# Altium PCB EB1_Spartan_III_1_02.PcbDoc (part 4 of 4)
Units mm, origin at the board's own origin, x right, y up, seen from the top; angles counter-clockwise.
Board outline 165.1 x 115.01 mm, 6 copper layers (Top Layer, MidLayer1, VCC Plane, GND Plane, MidLayer2, Bottom Layer); 356 components, 386 nets, 1788 pads, 779 vias.
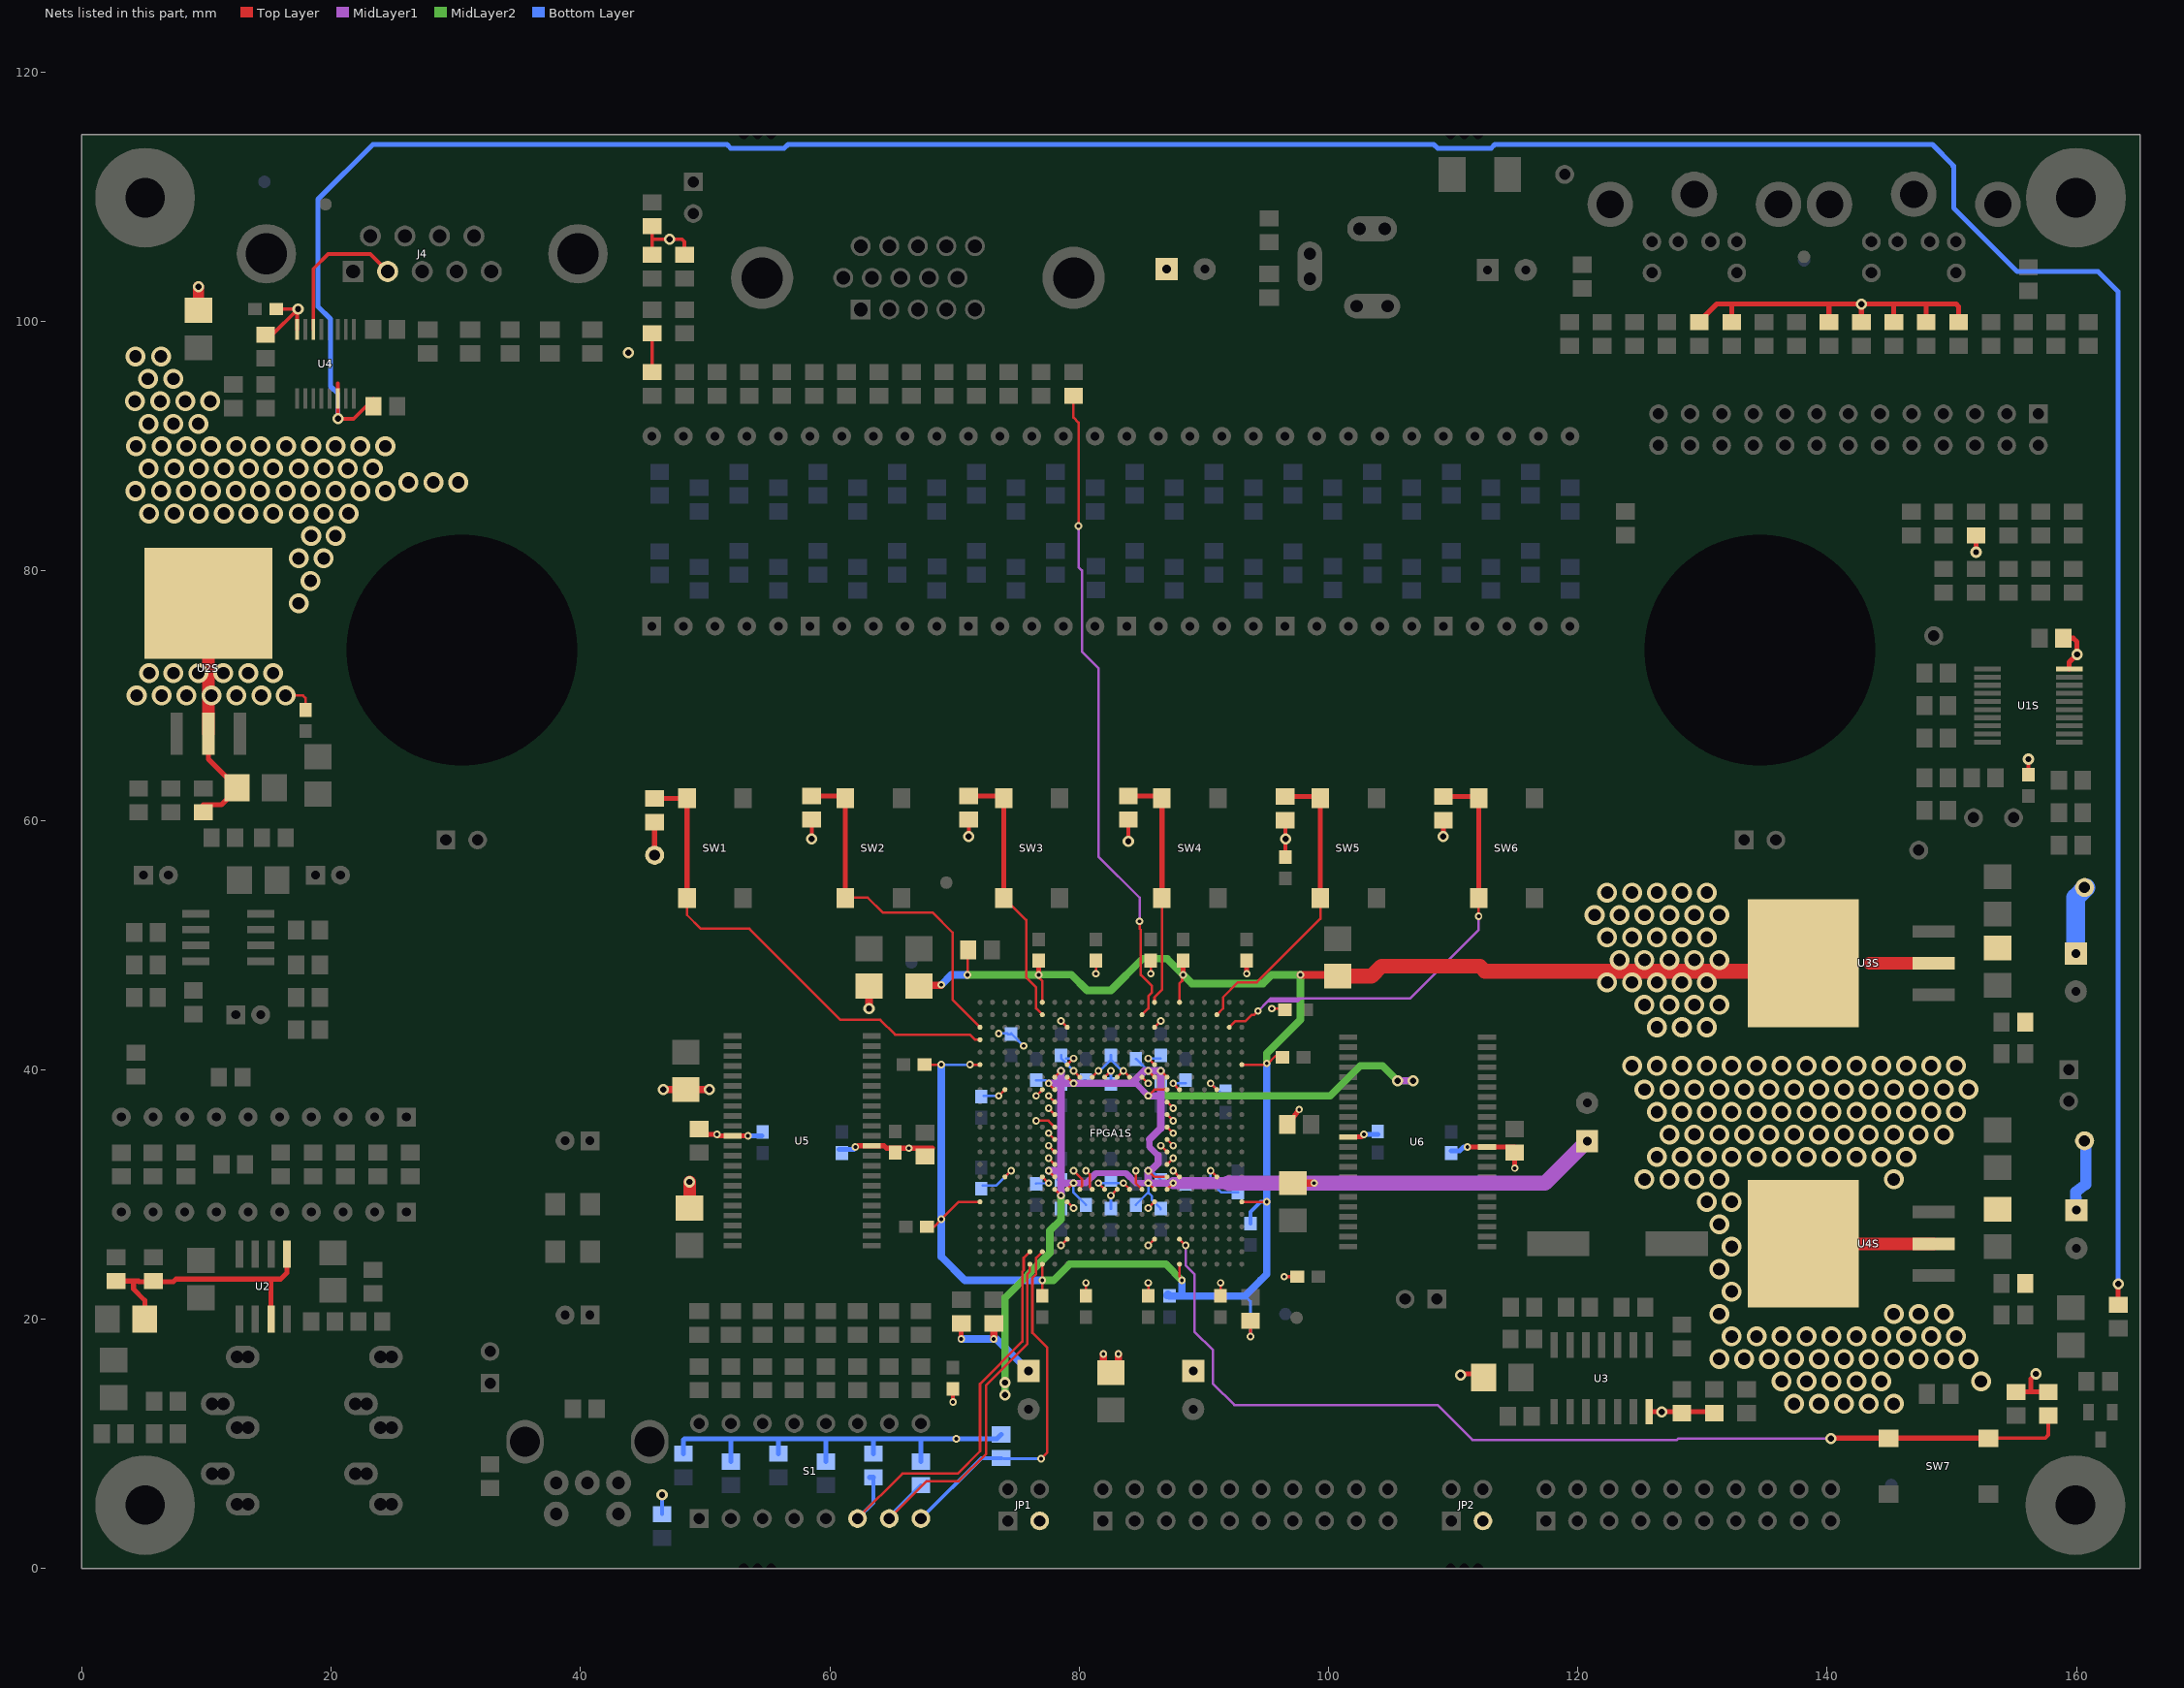
[diagram p8: the nets of this part, all layers, seen from the top]

## Via types
v1: diameter 0.6, hole 0.3, Top Layer to Bottom Layer, tented both sides, 427 vias
v2: diameter 1.6, hole 1, Top Layer to Bottom Layer, 224 vias
v3: diameter 0.9, hole 0.5, Top Layer to Bottom Layer, tented both sides, 126 vias
v4: diameter 1.27, hole 0.711, Top Layer to Bottom Layer, tented both sides, 2 vias

## Nets (pads, with @x,y where several pads share a name; then routed paths per layer and width w, separated by ;. In a path a pad name is that pad's centre, name@x,y a point inside that pad or via, vN(x,y) a via of type N, cw(c..) or ccw(c..) an arc to the next point about the centre after c; other vN are vias at no path point) (continued)
SW_DIP5: FPGA1S.AA5 R16.1 S1.6 | length 33.9
  Top Layer w0.2: S1.6@62.23,4 65.83,7.6 70.25,7.6 72.05,9.4 72.05,14.8 75.45,18.2 75.45,23.8 75.55,23.9 75.55,24.9 FPGA1S.AA5@76.05,25.4
  Bottom Layer w0.3: S1.6@62.23,4 63.5,5.27 R16.1@63.5,7.305
  Bottom Layer w0.4: R16.1@63.185,7.305 R16.1@63.5,7.305
SW_DIP6: FPGA1S.AB5 R17.1 S1.7 | length 30.3
  Top Layer w0.2: S1.7@64.77,4 67.77,7 70.35,7 72.55,9.2 72.55,14.7 75.85,18 75.85,23.6 76.05,23.8 FPGA1S.AB5@76.05,24.4
  Bottom Layer w0.3: S1.7@64.77,4 64.77,4.13 R17.1@67.31,6.67
SW_DIP7: FPGA1S.AA6 R18.1 S1.8 | length 29.2
  Top Layer w0.2: v1(76.95,8.8) 77.45,9.3 77.45,17.7 76.25,18.9 76.25,23.3 76.55,23.6 76.55,24.9 FPGA1S.AA6@77.05,25.4
  Bottom Layer w0.2: R18.1@73.95,8.8 v1(76.95,8.8)
  Bottom Layer w0.3: S1.8@67.31,4 72.16,8.85 R18.1@73.75,8.85
  Bottom Layer w0.4: S1.8@67.09,4.07 S1.8@67.165,4.145
SW_TEST: FPGA1S.Y17 R21.2 SW7.1 SW7.2 | length 83.3
  Top Layer w0.2: FPGA1S.Y17@88.05,26.4 v1(88.55,25.9)
  Top Layer w0.3: SW7.2@153.09,10.45 157.5,10.45 157.75,10.7 R21.2@157.75,12.25
  Top Layer w0.4: v3(140.29,10.4) 140.34,10.45 SW7.1@144.94,10.45 SW7.2@152.95,10.45 SW7.2@153.09,10.45
  MidLayer1 w0.2: v1(88.55,25.9) 88.55,24.3 89.25,23.6 89.25,19 90.75,17.5 90.75,14.8 92.45,13.1 108.75,13.1 111.55,10.3 127.95,10.3 128.05,10.4 v3(140.29,10.4)
SW_USER0: FPGA1S.D1 R9.2 SW1.1 SW1.2 | length 39.6
  Top Layer w0.2: SW1.1@48.55,53.775 48.55,52.4 49.65,51.3 53.55,51.3 60.85,44 64.05,44 65.25,42.8 71.25,42.8 71.65,42.4 FPGA1S.D1@72.05,42.4
  Top Layer w0.4: R9.2@45.95,61.75 48.515,61.75 SW1.2@48.55,61.785 SW1.1@48.55,53.775
SW_USER1: FPGA1S.C1 R10.2 SW2.1 SW2.2 | length 29
  Top Layer w0.2: SW2.1@61.25,53.8 63.05,53.8 64.25,52.6 68.25,52.6 69.85,51 69.85,45.6 FPGA1S.C1@72.05,43.4
  Top Layer w0.4: R10.2@58.55,61.95 61.085,61.95 SW2.2@61.25,61.785 61.25,53.8 SW2.1@61.25,53.775
SW_USER2: FPGA1S.B6 R19.2 SW3.1 SW3.2 | length 21.5
  Top Layer w0.2: SW3.1@73.95,53.775 73.975,53.775 75.75,52 75.75,47.4 76.55,46.6 76.55,44.9 FPGA1S.B6@77.05,44.4
  Top Layer w0.4: R19.2@71.15,61.95 73.9,61.95 SW3.2@73.95,62 ; SW3.1@73.95,53.775 SW3.2@73.95,61.785
SW_USER3: FPGA1S.A15 R20.2 SW4.1 SW4.2 | length 19.3
  Top Layer w0.2: FPGA1S.A15@86.05,45.4 86.05,45.8 86.65,46.4 SW4.1@86.65,53.775
  Top Layer w0.4: R20.2@83.95,61.95 86.5,61.95 SW4.2@86.55,62 ; SW4.1@86.65,53.775 SW4.2@86.65,61.785
SW_USER4: FPGA1S.B20 R22.2 SW5.1 SW5.2 | length 24.6
  Top Layer w0.2: FPGA1S.B20@91.05,44.4 91.55,44.9 91.55,45.8 92.75,47 94.25,47 99.35,52.1 SW5.1@99.35,53.775
  Top Layer w0.4: R22.2@96.52,61.91 99.225,61.91 SW5.2@99.35,61.785 SW5.1@99.35,53.775
SW_USER5: FPGA1S.C21 R23.2 SW6.1 SW6.2 | length 39.4
  Top Layer w0.2: FPGA1S.C21@92.05,43.4 92.55,43.9 93.35,43.9 93.85,44.4 94.05,44.4 v1(94.35,44.7) ; v1(112.05,52.3) SW6.1@112.05,53.775
  Top Layer w0.4: R23.2@109.22,61.91 111.925,61.91 SW6.2@112.05,61.785 SW6.1@112.05,53.775
  MidLayer1 w0.2: v1(94.35,44.7) 95.15,45.5 ; v1(112.05,52.3) 112.05,51.2 106.55,45.7 97.75,45.7 ; 95.15,45.5 97.55,45.5 97.75,45.7 ; 95.15,45.5 95.35,45.7 97.75,45.7
TX: J4.2 U4.14 | length 11.9
  Top Layer w0.3: U4.14@18.575,99.375 18.575,104.225 19.75,105.4 23.15,105.4 J4.2@24.535,104.015
V-232: C23.1 R30S.2 U4.6 | length 259.5
  Top Layer w0.3: 20.525,95.025 U4.6@20.525,93.825 20.525,92.425 v3(20.55,92.2) 21.8,92.2 23.1,93.5 C23.1@23.4,93.8
  Top Layer w0.4: R30S.2@163.35,21.15 v3(163.35,22.8)
  Bottom Layer w0.4: v3(20.55,92.2) 20.55,94.2 19.95,94.8 19.95,100.2 18.95,101.2 18.95,109.8 23.35,114.2 51.75,114.2 52.05,113.9 56.35,113.9 56.65,114.2 108.45,114.2 108.75,113.9 113.05,113.9 113.35,114.2 148.45,114.2 150.15,112.5 150.15,112.4 ; 150.1,112.45 150.15,112.4 ; v3(163.35,22.8) 163.35,102.4 161.75,104 155.25,104 150.15,109.1 150.15,112.4
VAREF: C4.1 R7.2 R8.1 U2.3 U2.5 | length 22.4
  Top Layer w0.4: R8.1@2.75,23.05 4.15,23.05 ; 4.55,23 5.75,23 7.35,23 7.55,23.2 15.15,23.2 ; 4.55,23.05 4.15,23.05 ; C4.1@5.05,20 5.05,21.5 4.15,22.4 4.15,23.05 ; U2.3@15.185,20 15.185,23.165 15.15,23.2 ; U2.5@16.455,25.2 16.455,23.705 16.195,23.445 15.95,23.2 15.15,23.2
  Top Layer w0.6: R7.2@5.75,23.05 5.8,23.05 R7.2@5.95,23.2
VCC: C1S.1 C2S.1 C3S.1 C4S.1 C5S.1 C6S.1 C7S.1 C8S.1 C13S.1 C14S.1 C15S.1 C16S.1 C17S.1 C18.1 C18S.1 C19.1 C19S.1 C20S.1 C21.1 C21S.1 C22S.1 C23S.1 C24.1 C24S.1 C25.2 C25S.1 C26.2 C26S.1 C27.2 C27S.1 C28.2 C28S.1 C29.2 C29S.1 C30S.1 C31S.1 C32S.1 C33S.1 C34S.1 C51S.1 C54S.1 C55S.1 C56S.1 C57S.1 C68S.1 C69S.1 C74S.1 C80S.1 FPGA1S.C8 FPGA1S.C15 FPGA1S.F8 FPGA1S.F15 FPGA1S.G9 FPGA1S.G10 FPGA1S.G11 FPGA1S.G12 FPGA1S.G13 FPGA1S.G14 FPGA1S.H3 FPGA1S.H6 FPGA1S.H17 FPGA1S.H20 FPGA1S.J7 FPGA1S.J16 FPGA1S.K7 FPGA1S.K16 FPGA1S.L7 FPGA1S.L16 FPGA1S.M7 FPGA1S.M16 FPGA1S.N7 FPGA1S.N16 FPGA1S.P7 FPGA1S.P16 FPGA1S.R3 FPGA1S.R6 FPGA1S.R17 FPGA1S.R20 FPGA1S.T9 FPGA1S.T10 FPGA1S.T11 FPGA1S.T12 FPGA1S.T13 FPGA1S.T14 FPGA1S.U8 FPGA1S.U15 FPGA1S.Y8 FPGA1S.Y15 JP1.3 JP2.3 R9.1 R10.1 R11.2 R12.2 R13.2 R13S.1 R14.2 R14S.1 R15.2 R15S.1 R16.2 R16S.1 R17.2 R17S.1 R18.2 R18S.1 R19.1 R19S.1 R20.1 R20S.1 R21.1 R22.1 R23.1 R32S.2 R73.2 R82.1 R96.2 R97.2 R98.2 R99.2 TP7S.1 U1S.20 U2S.2 U2S.4 U3.14 U4.16 U5.11 U5.33 U6.11 U6.33 | length 231.3
  Top Layer w0.2: v2(16.35,70) 17.75,70 17.95,69.8 C3S.1@17.95,68.85 ; v1(73.55,37.9) FPGA1S.H3@74.05,38.4 ; FPGA1S.R3@74.05,31.4 v1(74.55,31.9) ; v1(76.55,35.9) 77.55,35.9 FPGA1S.L7@78.05,35.4 ; v1(76.55,37.9) FPGA1S.H6@77.05,38.4 ; FPGA1S.R6@77.05,31.4 v1(77.55,30.9) ; v1(77.55,32.9) FPGA1S.P7@78.05,32.4 ; v1(77.55,33.9) FPGA1S.N7@78.05,33.4 ; v1(77.55,34.9) FPGA1S.M7@78.05,34.4 ; v1(77.55,36.9) FPGA1S.K7@78.05,36.4 ; v1(77.55,37.9) FPGA1S.J7@78.05,37.4 ; v1(78.55,25.9) FPGA1S.Y8@79.05,26.4 ; v1(78.55,43.9) FPGA1S.C8@79.05,43.4 ; FPGA1S.U8@79.05,29.4 v1(79.55,28.9) ; FPGA1S.F8@79.05,40.4 v1(79.55,40.9) ; v1(79.55,31.9) 80.25,31.2 80.25,30.7 FPGA1S.T9@80.05,30.4 ; v1(79.55,39.9) FPGA1S.G9@80.05,39.4 ; C7S.1@80.55,21.85 v1(80.55,22.9) ; v1(80.55,31.9) 80.85,31.6 80.85,30.6 FPGA1S.T10@81.05,30.4 ; FPGA1S.G10@81.05,39.4 v1(81.55,39.9) ; v1(81.35,47.7) C16S.1@81.35,48.7 ; v1(81.55,30.9) FPGA1S.T11@82.05,30.4 ; FPGA1S.G11@82.05,39.4 v1(82.55,39.9) ; v1(82.55,29.9) FPGA1S.T12@83.05,30.4 ; FPGA1S.G12@83.05,39.4 v1(83.55,39.9) 83.95,39.5 FPGA1S.G13@84.05,39.4 ; v1(83.55,30.9) FPGA1S.T13@84.05,30.4 ; v1(84.55,31.9) 84.55,30.9 FPGA1S.T14@85.05,30.4 ; FPGA1S.G14@85.05,39.4 v1(85.55,38.9) ; C29S.1@85.55,21.85 v1(85.55,22.9) v1@85.55,23 ; v1(85.55,25.9) FPGA1S.Y15@86.05,26.4 ; v1(85.55,28.9) FPGA1S.U15@86.05,29.4 ; v1(85.55,40.9) FPGA1S.F15@86.05,40.4 ; v1(85.75,47.7) C24S.1@85.75,48.75 ; FPGA1S.C15@86.05,43.4 v1(86.55,43.9) ; v1(86.55,33.9) FPGA1S.N16@87.05,33.4 ; FPGA1S.P16@87.05,32.4 v1(87.55,32.9) ; FPGA1S.M16@87.05,34.4 v1(87.55,33.9) ; FPGA1S.L16@87.05,35.4 v1(87.55,34.9) ; FPGA1S.K16@87.05,36.4 v1(87.55,35.9) ; FPGA1S.J16@87.05,37.4 v1(87.55,36.9) ; v1(87.55,31.9) FPGA1S.R17@88.05,31.4 ; v1(87.55,38.9) FPGA1S.H17@88.05,38.4 ; v1(90.55,31.9) FPGA1S.R20@91.05,31.4 ; v1(90.55,38.9) FPGA1S.H20@91.05,38.4 ; C2S.1@91.35,21.85 91.35,22.8 v1(91.35,22.9) ; v1(95.45,44.9) 96.5,44.9 96.55,44.9 96.532,44.795 C1S.1@96.5,44.6
  Top Layer w0.3: C21.1@14.75,98.95 15.3,98.95 v3@17.275,100.925 ; C26S.1@15.6,101 v3(17.35,101) v3@17.275,100.925 ; U4.16@17.275,99.375 v3@17.275,100.925 ; C24.1@45.75,95.95 R96.2@45.75,99.05 ; R97.2@45.75,105.35 45.75,106.6 ; R99.2@45.75,107.65 45.75,106.6 ; R98.2@48.35,105.35 48.35,106.4 48.15,106.6 v3(47.15,106.6) 45.75,106.6 ; v3(58.55,58.5) R10.1@58.55,60.05 R10.1@58.55,60.1 ; v1(69.885,13.345) C13S.1@69.885,14.395 C13S.1@69.885,14.445 ; v3(71.15,58.7) R19.1@71.15,60.05 ; v3(83.95,58.3) R20.1@83.95,60 ; v1(96.45,23.4) C8S.1@97.5,23.4 C8S.1@97.55,23.4 ; R22.1@96.52,60.01 96.55,59.98 v3(96.55,58.5) C25S.1@96.55,57.05 C25S.1@96.55,57 ; C21S.1@156.15,63.65 v3(156.15,64.9)
  Top Layer w0.4: R32S.2@9.75,61.25 11.2,61.25 12.45,62.5 C74S.1@12.45,62.6 10.15,64.9 U2S.2@10.15,66.95 ; TP7S.1@45.95,57.2 R9.1@45.95,59.85 ; C26.2@49.55,34.8 v1(50.95,34.8) 51.06,34.69 U5.11@52.21,34.69 v1(53.44,34.69) ; v1(62.05,33.8) 62.25,33.9 63.36,33.9 U5.33@63.45,33.9 ; U5.33@63.36,33.89 64.36,33.89 64.55,33.7 65.25,33.7 v1(66.35,33.7) 67.65,33.7 68.25,33.7 ; v1(93.45,47.7) C4S.1@93.45,48.75 ; C27.2@97.05,36 v1(97.65,36.8) ; U6.11@101.575,34.6 102.65,34.6 v1(102.85,34.8) ; v3(109.2,58.7) 109.22,58.72 R23.1@109.22,60.01 ; v3(110.6,15.5) 110.7,15.6 C56S.1@112.45,15.6 ; v1(111.15,33.8) U6.33@112.725,33.8 ; U6.33@112.75,33.8 U6.33@112.725,33.8 ; v1(114.95,32.1) C25.2@114.95,33.3 ; C25.2@114.95,33.8 114.935,33.8 U6.33@112.725,33.8 ; U3.14@125.73,12.565 v3(126.75,12.565) 128.35,12.565 130.435,12.565 R82.1@130.55,12.45 ; R19S.1@129.75,99.95 129.75,100 131.15,101.4 132.35,101.4 ; R18S.1@132.35,100.1 132.35,101.4 ; R17S.1@140.15,99.95 140.15,101.4 ; R16S.1@142.75,99.95 v3(142.75,101.4) ; R15S.1@145.35,99.95 145.35,101.4 ; R20S.1@147.95,99.95 147.95,101.4 ; R14S.1@150.55,99.95 150.55,101.2 150.35,101.4 147.95,101.4 ; v3(151.95,81.5) R13S.1@151.95,82.85 ; R73.2@155.15,14.15 156.35,14.15 ; v3(156.75,15.6) 156.35,15.2 156.35,14.15 ; R21.1@157.75,14.15 156.35,14.15 ; C68S.1@158.85,74.6 C68S.1@158.95,74.6 159.75,74.6 160.05,74.3 v3(160.05,73.3) 159.425,72.675 U1S.20@159.425,72.125 ; 132.35,101.4 140.15,101.4 ; 140.15,101.4 v3(142.75,101.4) ; v3(142.75,101.4) 145.35,101.4 ; 145.35,101.4 147.95,101.4
  Top Layer w0.6: v3(46.65,38.4) C55S.1@48.45,38.4 v3(50.35,38.4) ; v3(63.15,44.9) C54S.1@63.15,46.7 ; C57S.1@81.95,15.7 v1(81.95,17.2) ; C57S.1@83.15,16.2 v1(83.15,17.2)
  Top Layer w0.9: C18.1@9.35,100.8 C18.1@9.35,100.9 v3(9.35,102.8)
  Top Layer w1: U2S.4@10.05,74.6 10.15,74.5 10.15,71.8 10.15,70 U2S.2@10.15,66.95 ; C19.1@48.75,28.9 v3(48.75,31)
  Bottom Layer w0.2: C15S.1@72.25,30.7 73.35,30.7 v1(74.55,31.9) ; C27S.1@72.35,37.9 v1(73.55,37.9) ; v1(73.55,42.9) 74.25,42.9 74.3,42.85 C34S.1@74.55,42.85 ; C34S.1@74.55,42.9 74.575,42.875 v1(75.55,41.9) ; C5S.1@76.55,30.85 v1(77.55,30.9) ; C32S.1@78.55,41.15 78.55,40.9 v1(79.55,39.9) ; C32S.1@78.95,40.9 v1(79.55,40.9) ; v1(81.55,30.9) 82.55,30.9 v1(83.55,30.9) ; v1(81.55,39.9) 81.65,39.9 C28S.1@82.55,40.8 ; C80S.1@82.55,28.85 v1(82.55,29.9) ; C23S.1@82.55,38.85 v1(82.55,39.9) ; C28S.1@82.55,41.15 C28S.1@82.55,40.8 ; v1@83.55,40 v1(83.55,39.9) 83.45,39.9 C28S.1@82.55,40.8 ; v1(85.55,40.9) C19S.1@86.55,40.9 ; v1(87.55,38.9) C31S.1@88.55,38.9 ; v1(90.55,31.9) 90.55,31 91.4,30.15 C14S.1@92.75,30.15 ; v1(90.55,38.9) 91.531,38.009 C33S.1@91.65,37.9
  Bottom Layer w0.3: R11.2@46.55,4.35 v3(46.55,5.9)
  Bottom Layer w0.4: R12.2@48.26,9.205 48.26,10.31 48.35,10.4 52.15,10.4 ; R13.2@52.07,8.57 52.07,10.32 52.15,10.4 ; v1(53.44,34.69) 53.45,34.7 C18S.1@54.55,34.7 ; R14.2@55.88,9.205 55.88,10.27 55.75,10.4 ; R15.2@59.69,8.57 59.69,10.34 59.75,10.4 ; C17S.1@60.75,33.6 60.96,33.6 61.95,33.6 v1(62.05,33.8) ; R16.2@63.5,9.205 63.5,10.35 63.55,10.4 ; R17.2@67.31,8.57 67.31,10.36 67.27,10.4 ; R18.2@73.75,10.75 73.4,10.4 v1(70.15,10.4) 67.27,10.4 ; v1(102.85,34.8) C20S.1@103.95,34.8 ; C6S.1@109.85,33.5 109.855,33.5 110.55,33.5 110.85,33.8 v1(111.15,33.8) ; v3@151.85,81.4 v3(151.95,81.5) ; 52.15,10.4 55.75,10.4 ; 55.75,10.4 59.75,10.4 ; 59.75,10.4 63.55,10.4 ; 63.55,10.4 67.27,10.4
  other v2: 4.4,70 6.4,70 8.4,70 10.4,70 12.4,70 14.4,70 5.4,71.8 7.35,71.8 9.35,71.8 11.35,71.8 13.35,71.8 15.35,71.8 17.4,77.4 18.35,79.2 17.4,81 19.4,81 18.4,82.8 20.35,82.8 5.4,84.6 7.4,84.6 9.4,84.6 11.4,84.6 13.35,84.6 15.35,84.6 17.4,84.6 19.4,84.6 21.4,84.6 4.3,86.4 6.35,86.4 8.35,86.4 10.35,86.4 12.35,86.4 14.3,86.4 16.35,86.4 18.35,86.4 20.35,86.4 22.35,86.4 24.35,86.4 26.2,87.1 28.2,87.1 30.2,87.1 5.35,88.2 7.4,88.2 9.4,88.2 11.4,88.2 13.4,88.2 15.35,88.2 17.4,88.2 19.4,88.2 21.35,88.2 23.35,88.2 4.35,90 6.4,90 8.4,90 10.35,90 12.4,90 14.35,90 16.4,90 18.4,90 20.35,90 22.35,90 24.35,90 5.35,91.8 7.35,91.8 9.35,91.8 4.25,93.6 6.3,93.6 8.3,93.6 10.3,93.6 5.3,95.4 7.35,95.4 4.3,97.2 6.35,97.2
  other v3: 43.85,97.5
VCCAUX: C9S.1 C10S.1 C35S.1 C36S.1 C37S.1 C38S.1 C39S.1 C40S.1 C52S.1 C58S.1 C59S.1 C71S.1 C76S.1 FPGA1S.A6 FPGA1S.A17 FPGA1S.AB6 FPGA1S.AB17 FPGA1S.F1 FPGA1S.F22 FPGA1S.U1 FPGA1S.U22 R1S.1 R2S.1 R3S.1 R4S.1 R33S.2 TP5S.1 U3S.2 U3S.4 | length 202.6
  Top Layer w0.2: C35S.1@67.6,27.4 C35S.1@67.8,27.4 68.35,27.4 v1(68.95,28) 70.35,29.4 FPGA1S.U1@72.05,29.4 ; C10S.1@67.6,40.4 v1(68.95,40.4) ; v1(71.05,47.6) 71.05,49.1 71.1,49.15 R2S.1@71.1,49.6 ; v1(76.75,47.6) 76.835,47.315 77.05,47.1 FPGA1S.A6@77.05,45.4 ; C36S.1@76.835,21.805 76.835,21.85 76.841,21.886 76.844,21.903 76.886,21.963 76.919,22.01 77.05,22.2 v1(77.05,23.1) 77.05,23.3 FPGA1S.AB6@77.05,24.4 ; FPGA1S.AB17@88.05,24.4 88.05,23.4 v1(88.25,23.1) ; FPGA1S.A17@88.05,45.4 88.05,46.9 88.265,47.115 v1@88.265,47.6 ; FPGA1S.U22@93.05,29.4 v1(95.05,29.4) ; FPGA1S.F22@93.05,40.4 95.05,40.4 95.1,40.45 95.75,41.1 96.3,41.1 C38S.1@96.4,41.1 ; v1(93.75,18.6) R1S.1@93.75,19.85 ; v1(71.25,40.4) FPGA1S.F1@72.05,40.4 v1(71.25,40.4)
  Top Layer w0.4: v1(70.55,18.4) R3S.1@70.55,19.65 ; v1(76.75,47.6) C40S.1@76.75,48.75 ; v1(88.35,47.6) C39S.1@88.35,48.75
  Top Layer w0.6: C58S.1@67.15,46.76 v1@68.91,46.76 ; C58S.1@67.15,46.8 C58S.1@67.16,46.8 ; v1(73.15,18.4) R4S.1@73.15,19.65 ; v1(97.75,47.6) 100.65,47.6 C59S.1@100.75,47.5
  Top Layer w1: 143.39,48.54 U3S.2@148.55,48.54
  Top Layer w1.2: C59S.1@100.75,47.5 103.45,47.5 104.25,48.3 112.15,48.3 112.55,47.9 122.35,47.9 123.35,47.9 124.35,47.9 125.35,47.9 126.35,47.9 127.35,47.9 128.35,47.9 129.35,47.9 130.35,47.9 131.35,47.9 137.3,47.9 138.02,48.62 U3S.4@138.1,48.7
  MidLayer2 w0.6: v1(71.05,47.6) v1(76.75,47.6) ; v1@76.835,47.625 79.375,47.625 80.645,46.355 82.55,46.355 85.09,48.895 87.055,48.895 v1(88.35,47.6) 89.05,46.9 94.75,46.9 95.45,47.6 v1(97.75,47.6) 97.75,44 95.05,41.3 v1(95.05,40.5) ; v1(77.05,23.1) 77.95,23.1 79.25,24.4 86.95,24.4 v1(88.25,23.1)
  Bottom Layer w0.2: v1(68.95,40.4) v1(71.25,40.4) ; 93.3,21.85 93.75,21.4 v1(93.75,18.6)
  Bottom Layer w0.3: C9S.1@93.75,27.65 93.75,28.6 94.55,29.4 v1(95.05,29.4)
  Bottom Layer w0.6: v1(68.95,40.4) v1(68.95,28) 68.95,25 70.85,23.1 v1(77.05,23.1) ; v1(68.95,46.8) 69.75,47.6 v1(71.05,47.6) ; v1(70.55,18.4) v1(73.15,18.4) 73.35,18.4 C52S.1@75.95,15.824 ; C37S.1@87.125,21.975 87.05,21.9 C37S.1@87.25,21.9 ; C37S.1@87.25,21.85 88.25,21.85 ; v1(88.25,23.1) 88.25,21.85 ; v1(95.05,40.5) v1(95.05,29.4) 95.05,23.6 94.55,23.1 93.3,21.85 88.25,21.85
  Bottom Layer w1.5: C71S.1@159.95,49.324 159.95,53.8 160.707,54.557 TP5S.1@160.75,54.6
  other v2: 126.35,43.4 128.35,43.4 130.35,43.4 125.35,45.2 127.35,45.2 129.35,45.2 131.35,45.2 122.35,47 124.35,47 126.35,47 128.35,47 130.35,47 123.35,48.8 125.35,48.8 127.35,48.8 129.35,48.8 131.35,48.8 122.35,50.6 124.35,50.6 126.35,50.6 128.35,50.6 130.35,50.6 121.35,52.4 123.35,52.4 125.35,52.4 127.35,52.4 129.35,52.4 131.35,52.4 122.35,54.2 124.35,54.2 126.35,54.2 128.35,54.2 130.35,54.2
VCCINT: C11S.1 C12S.1 C41S.1 C42S.1 C43S.1 C44S.1 C45S.1 C46S.1 C47S.1 C48S.1 C49S.1 C50S.1 C53S.1 C60S.1 C72S.1 C78S.1 FPGA1S.G7 FPGA1S.G8 FPGA1S.G15 FPGA1S.G16 FPGA1S.H7 FPGA1S.H16 FPGA1S.R7 FPGA1S.R16 FPGA1S.T7 FPGA1S.T8 FPGA1S.T15 FPGA1S.T16 R37S.2 TP8S.1 U4S.2 U4S.4 | length 162.1
  Top Layer w0.2: v1(77.55,31.9) FPGA1S.R7@78.05,31.4 ; v1(77.55,38.9) FPGA1S.H7@78.05,38.4 ; FPGA1S.T7@78.05,30.4 v1(78.55,29.9) ; FPGA1S.G7@78.05,39.4 v1(78.55,39.9) ; FPGA1S.T8@79.05,30.4 v1(79.55,30.9) ; FPGA1S.G8@79.05,39.4 v1(79.55,38.9) ; v1(85.55,30.9) FPGA1S.T15@86.05,30.4 ; v1(85.55,31.9) 86.05,31.4 FPGA1S.R16@87.05,31.4 ; v1(85.55,37.9) 86.05,38.4 FPGA1S.H16@87.05,38.4 ; v1(85.55,39.9) FPGA1S.G15@86.05,39.4 ; v1(86.55,39.9) FPGA1S.G16@87.05,39.4 ; FPGA1S.T16@87.05,30.4 v1(87.55,30.9)
  Top Layer w0.6: C60S.1@97.15,30.9 v1(98.85,30.9)
  Top Layer w1: U4S.4@141.65,25.9 141.785,26.035 U4S.2@148.55,26.035
  MidLayer1 w0.5: v1(79.55,30.9) 80.55,30.9 81.35,31.7 83.75,31.7 84.55,30.9 v1(85.55,30.9) ; 84.55,38.9 v1(85.55,37.9) ; 85.65,34.4 85.65,33.8 86.35,33.1
  MidLayer1 w0.6: v1(77.55,31.9) 78.55,31.9 ; v1(77.55,38.9) 78.55,38.9 ; v1(78.55,29.9) 78.55,30.9 ; v1(78.55,39.9) 78.55,38.9 ; v1(79.55,30.9) 78.55,30.9 ; 84.55,38.9 84.45,38.9 ; v1(85.55,31.9) v1@85.55,31.7 ; v1(85.55,37.9) 86.45,37.9 86.55,38 ; 85.65,34.4 86.55,35.3 86.55,38 ; 86.35,33.1 86.35,32.5 85.65,31.8 v1@85.55,31.7 ; v1(87.55,30.9) v1(85.55,30.9) v1@85.55,31.7 ; v3(105.55,39.1) v3(106.8,39.1) ; 78.55,30.9 78.55,31.9 ; 78.55,31.9 78.55,38.9 ; 78.55,38.9 v1(79.55,38.9) 84.45,38.9 ; 84.45,38.9 84.45,39.1 85.25,39.9 v1(85.55,39.9) v1(86.55,39.9) 86.55,38
  MidLayer1 w1: v1(87.55,30.9) 91.95,30.9
  MidLayer1 w1.2: 91.95,30.9 v1(98.85,30.9) 117.374,30.9 C53S.1@120.75,34.276
  MidLayer2 w0.6: v3(74.05,13.9) v3(74.05,14.9) 74.05,21.7 77.65,25.3 77.65,27.1 78.55,28 v1(78.55,29.9) ; v1(86.55,39.9) 86.55,38.4 87.05,37.9 100.15,37.9 102.55,40.3 104.35,40.3 v3(105.55,39.1) v3(106.8,39.1)
  Bottom Layer w0.2: C45S.1@76.55,39.15 77.3,39.15 v1(77.55,38.9) ; v1(77.55,31.9) 78.3,31.15 C11S.1@78.55,31.15 ; C50S.1@78.55,28.85 78.55,28.9 v1(78.55,29.9) ; C49S.1@78.55,38.85 v1(78.55,39.9) ; v1(79.55,30.9) 79.55,30.15 C47S.1@80.55,29.15 ; v1(79.55,38.9) 80.15,38.9 80.4,39.15 C12S.1@80.55,39.15 ; C43S.1@84.55,29.15 85.525,30.125 85.55,30.15 ; C44S.1@84.55,40.85 84.6,40.85 v1(85.55,39.9) ; 85.55,30.1 85.6,30.1 85.85,29.85 85.85,29.55 C46S.1@86.55,28.85 C46S.1@86.55,28.8 ; v1(85.55,30.9) 85.55,30.15 ; v1(85.55,31.9) 85.8,31.9 C42S.1@86.55,31.15 ; 85.575,30.125 85.55,30.15 ; C41S.1@86.55,38.85 v1(86.55,39.9) ; v1(87.55,30.9) 88.5,30.9 C48S.1@88.55,30.85
  Bottom Layer w0.9: C72S.1@160,28.724 159.95,30.2 160.75,30.8 160.75,34.29 160.75,34.4 TP8S.1@160.655,34.29 160.655,34.395 TP8S.1@160.65,34.4
  other v2: 137.35,13.2 139.35,13.2 141.35,13.2 143.35,13.2 145.35,13.2 136.35,15 138.35,15 140.35,15 142.35,15 144.35,15 152.35,15 131.35,16.8 133.35,16.8 135.35,16.8 137.35,16.8 139.35,16.8 141.35,16.8 143.35,16.8 145.35,16.8 147.35,16.8 149.35,16.8 149.35,16.8 151.35,16.8 132.35,18.6 134.35,18.6 136.35,18.6 138.35,18.6 140.35,18.6 142.35,18.6 144.35,18.6 146.35,18.6 148.35,18.6 150.35,18.6 131.35,20.4 145.35,20.4 147.35,20.4 149.35,20.4 132.35,22.2 131.35,24 132.35,25.8 131.35,27.6 130.35,29.4 132.35,29.4 125.35,31.2 127.35,31.2 129.35,31.2 131.35,31.2 145.35,31.2 126.35,33 128.35,33 130.35,33 132.35,33 134.35,33 136.35,33 138.35,33 140.35,33 142.35,33 144.35,33 146.35,33 127.35,34.8 129.35,34.8 131.35,34.8 133.35,34.8 135.35,34.8 137.35,34.8 139.35,34.8 141.35,34.8 143.35,34.8 145.35,34.8 147.35,34.8 149.35,34.8 126.35,36.6 128.35,36.6 130.35,36.6 132.35,36.6 134.35,36.6 136.35,36.6 138.35,36.6 140.35,36.6 142.35,36.6 144.35,36.6 146.35,36.6 148.35,36.6 150.35,36.6 125.35,38.4 127.35,38.4 129.35,38.4 131.35,38.4 133.35,38.4 135.35,38.4 137.35,38.4 139.35,38.4 141.35,38.4 143.35,38.4 145.35,38.4 147.35,38.4 149.35,38.4 151.35,38.4 124.35,40.3 126.35,40.3 128.35,40.3 130.35,40.3 132.35,40.3 134.35,40.3 136.35,40.3 138.35,40.3 140.35,40.3 142.35,40.3 144.35,40.3 146.35,40.3 148.35,40.3 150.35,40.3
VSYNC: FPGA1S.B14 R95.1 | length 52.6
  Top Layer w0.2: R95.1@79.55,94.05 79.55,92.3 79.95,91.9 v1(79.95,83.6) ; v1(84.85,51.9) 84.85,51.3 84.95,51.2 84.95,47.6 85.062,47.488 85.85,46.7 85.85,46.2 85.55,45.9 85.55,44.9 FPGA1S.B14@85.05,44.4
  MidLayer1 w0.2: v1(79.95,83.6) 79.95,80.3 80.225,80.025 80.225,73.525 81.55,72.2 81.55,57.1 84.85,53.8 v1(84.85,51.9)
pads on no net: D2S.3 FPGA1S.A3 FPGA1S.A7 FPGA1S.A11 FPGA1S.A16 FPGA1S.AA3 FPGA1S.AA7 FPGA1S.AA9 FPGA1S.AA11 FPGA1S.AA14 FPGA1S.AA16 FPGA1S.AA19 FPGA1S.AB7 FPGA1S.AB9 FPGA1S.AB12 FPGA1S.AB14 FPGA1S.AB16 FPGA1S.AB19 FPGA1S.B4 FPGA1S.B7 FPGA1S.B11 FPGA1S.B12 FPGA1S.B16 FPGA1S.C2 FPGA1S.C3 FPGA1S.C4 FPGA1S.C12 FPGA1S.C16 FPGA1S.D2 FPGA1S.D3 FPGA1S.D4 FPGA1S.D5 FPGA1S.D8 FPGA1S.D12 FPGA1S.D16 FPGA1S.E2 FPGA1S.E3 FPGA1S.E4 FPGA1S.E5 FPGA1S.E8 FPGA1S.E10 FPGA1S.E12 FPGA1S.F4 FPGA1S.F5 FPGA1S.F6 FPGA1S.F9 FPGA1S.F10 FPGA1S.F11 FPGA1S.F12 FPGA1S.F13 FPGA1S.F14 FPGA1S.F16 FPGA1S.G3 FPGA1S.G4 FPGA1S.G5 FPGA1S.G20 FPGA1S.H1 FPGA1S.H2 FPGA1S.H4 FPGA1S.H18 FPGA1S.H19 FPGA1S.H21 FPGA1S.H22 FPGA1S.J1 FPGA1S.J2 FPGA1S.J4 FPGA1S.J5 FPGA1S.J6 FPGA1S.J17 FPGA1S.J18 FPGA1S.J19 FPGA1S.J21 FPGA1S.J22 FPGA1S.K5 FPGA1S.K6 FPGA1S.K17 FPGA1S.K18 FPGA1S.N5 FPGA1S.N6 FPGA1S.N17 FPGA1S.N18 FPGA1S.N19 FPGA1S.N20 FPGA1S.P1 FPGA1S.P2 FPGA1S.P4 FPGA1S.P5 FPGA1S.P6 FPGA1S.P17 FPGA1S.P18 FPGA1S.P19 FPGA1S.P21 FPGA1S.P22 FPGA1S.R1 FPGA1S.R2 FPGA1S.R4 FPGA1S.R5 FPGA1S.R19 FPGA1S.R21 FPGA1S.R22 FPGA1S.T3 FPGA1S.T19 FPGA1S.T20 FPGA1S.U9 FPGA1S.U12 FPGA1S.U13 FPGA1S.U14 FPGA1S.U17 FPGA1S.V11 FPGA1S.V12 FPGA1S.V15 FPGA1S.W7 FPGA1S.W8 FPGA1S.W11 FPGA1S.W12 FPGA1S.W15 FPGA1S.W18 FPGA1S.Y4 FPGA1S.Y7 FPGA1S.Y11 FPGA1S.Y12 J1S.1 J1S.6 J1S.14 J1S.16 J1S.26 J2.2 J2.8 J3.2 J3.8 J4.9 J5.4 J5.9 J5.11 J5.12 J5.15 U3.10 U3.12

## Polygon pours and split planes (outlines as drawn)
GND on Top Layer "Top Layer-GND" (solid, remove dead copper, pour order 1003): 23.63,59.88 23.664,59.8 23.664,41.4 23.63,41.32 23.55,41.286 0.55,41.286 0.47,41.32 0.436,41.4 0.436,59.8 0.47,59.88 0.55,59.914 23.55,59.914
VCCAUX on Top Layer "Top Layer-VCCAUX" (solid, remove dead copper, pour order 1002): 166.688,60.18 166.722,60.1 166.722,59.63 166.864,40.001 166.863,40 166.864,40 166.847,39.96 166.831,39.92 166.83,39.92 166.791,39.903 166.751,39.886 166.75,39.887 166.75,39.886 151.968,39.886 151.932,39.901 151.895,39.912 148.658,42.59 106.91,42.59 106.874,42.605 106.837,42.616 98.878,49.198 98.875,49.203 98.87,49.206 98.855,49.241 98.837,49.275 98.839,49.281 98.836,49.286 98.836,60.1 98.87,60.18 98.95,60.214 166.608,60.214
VCC on Top Layer "Top Layer-VCC" (solid, remove dead copper, pour order 1001): 122.13,116.88 122.164,116.8 122.164,61 122.13,60.92 122.05,60.886 -1.45,60.886 -1.53,60.92 -1.564,61 -1.564,116.8 -1.53,116.88 -1.45,116.914 122.05,116.914
VCCINT on Top Layer "Top Layer-VCCINT" (solid, remove dead copper, pour order 1000): 166.55,53.214 166.551,53.214 166.59,53.197 166.63,53.18 166.631,53.18 166.647,53.14 166.664,53.1 166.664,53.099 166.364,-1.101 166.347,-1.14 166.33,-1.18 166.33,-1.181 166.29,-1.197 166.25,-1.214 91.95,-1.214 91.87,-1.18 91.836,-1.1 91.836,53.1 91.87,53.18 91.95,53.214 166.55,53.214
VCC on MidLayer1 "MidLayer1-VCC" (solid, remove dead copper, pour order 1005): 128.13,116.38 128.164,116.3 128.164,-3 128.13,-3.08 128.05,-3.114 -4.15,-3.114 -4.151,-3.113 -4.152,-3.114 -4.191,-3.097 -4.23,-3.08 -4.231,-3.079 -4.232,-3.079 -4.247,-3.039 -4.264,-3 -4.263,-2.999 -4.264,-2.998 -1.664,116.302 -1.647,116.341 -1.63,116.38 -1.629,116.381 -1.629,116.382 -1.589,116.397 -1.55,116.414 128.05,116.414
VCCINT on MidLayer1 "MidLayer1-VCCINT" (solid, remove dead copper, pour order 1004): 166.33,116.68 166.364,116.6 166.364,-1.2 166.33,-1.28 166.25,-1.314 73.464,-1.314 73.464,-2.4 73.447,-2.44 73.431,-2.48 73.43,-2.48 73.39,-2.497 73.35,-2.514 73.31,-2.497 73.27,-2.481 73.27,-2.48 73.253,-2.44 73.236,-2.4 73.036,44 73.053,44.04 73.069,44.08 73.07,44.08 73.109,44.097 73.15,44.114 111.903,44.114 124.636,56.847 124.636,116.6 124.67,116.68 124.75,116.714 166.25,116.714
GND on MidLayer2 "MidLayer2-GND 1" (solid, remove dead copper, pour order 1010): 117.476,118.223 117.476,118.224 167.006,117.589 167.046,117.572 167.085,117.555 167.086,117.555 167.086,117.554 167.102,117.515 167.119,117.475 167.119,52.07 167.085,51.99 167.005,51.956 117.475,51.956 117.395,51.99 117.361,52.07 117.361,118.11 117.362,118.111 117.361,118.111 117.378,118.151 117.395,118.19 117.395,118.191 117.396,118.191 117.435,118.207 117.475,118.224
GND on MidLayer2 "MidLayer2-GND" (solid, remove dead copper, pour order 1009): 16.59,61.675 19.097,59.169 25.353,59.169 27.225,61.04 27.305,61.074 34.925,61.074 35.005,61.04 45.165,50.88 45.199,50.8 45.199,19.732 47.705,17.225 47.715,17.202 47.739,17.145 47.739,-1.27 47.705,-1.35 47.625,-1.384 -1.905,-1.384 -1.906,-1.383 -1.906,-1.384 -1.946,-1.367 -1.985,-1.35 -1.986,-1.35 -2.002,-1.31 -2.019,-1.27 -2.018,-1.269 -2.019,-1.269 -1.384,61.596 -1.367,61.636 -1.35,61.675 -1.35,61.676 -1.31,61.692 -1.27,61.709 16.51,61.709
VCC on MidLayer2 "MidLayer2-VCC" (solid, remove dead copper, pour order 1008): 118.785,117.572 118.825,117.556 118.825,117.555 118.842,117.515 118.859,117.476 118.859,117.475 118.859,67.31 118.825,67.23 114.38,62.785 114.3,62.751 25.4,62.751 25.32,62.785 20.908,67.196 -2.54,67.196 -2.62,67.23 -2.654,67.31 -2.654,116.84 -2.637,116.88 -2.621,116.92 -2.62,116.92 -2.58,116.937 -2.541,116.954 118.744,117.589 118.745,117.589
VCCINT on MidLayer2 "MidLayer2-VCCINT" (solid, remove dead copper, pour order 1007): 168.276,42.658 168.276,42.659 168.316,42.642 168.355,42.625 168.356,42.625 168.356,42.624 168.372,42.585 168.389,42.545 168.388,42.544 168.389,42.544 167.754,-7.621 167.737,-7.661 167.72,-7.7 167.72,-7.701 167.719,-7.701 167.68,-7.717 167.64,-7.734 167.639,-7.733 167.639,-7.734 167.599,-7.717 167.56,-7.7 167.559,-7.7 167.559,-7.699 167.543,-7.66 167.526,-7.62 167.526,-3.289 71.12,-3.289 71.04,-3.255 71.006,-3.175 71.006,42.545 71.04,42.625 71.12,42.659 168.275,42.659
VCCAUX on MidLayer2 "MidLayer2-VCCAUX" (solid, remove dead copper, pour order 1006): 164.289,56.998 164.328,56.982 164.329,56.981 164.33,56.98 164.346,56.941 164.364,56.903 164.764,41.903 164.763,41.902 164.764,41.9 164.748,41.861 164.732,41.822 164.731,41.821 164.73,41.82 164.691,41.804 164.653,41.786 164.652,41.787 164.65,41.786 111.597,41.786 97.364,27.553 97.364,18.6 97.33,18.52 90.63,11.82 90.55,11.786 66.15,11.786 66.07,11.82 66.036,11.9 66.036,49.9 66.07,49.98 66.15,50.014 75.403,50.014 78.77,53.38 78.85,53.414 118.203,53.414 121.77,56.98 121.85,57.014 164.25,57.014
VCCINT on Bottom Layer "Bottom Layer-VCCINT" (solid, remove dead copper, pour order 1013): 168.13,66.18 168.164,66.1 168.164,-4.2 168.13,-4.28 168.05,-4.314 66.25,-4.314 66.17,-4.28 66.136,-4.2 66.136,45.6 66.17,45.68 66.25,45.714 107.503,45.714 119.27,57.48 119.35,57.514 141.803,57.514 150.47,66.18 150.55,66.214 168.05,66.214
VCC on Bottom Layer "Bottom Layer-VCC" (solid, remove dead copper, pour order 1012): 83.9,116.92 83.934,116.84 83.934,-7.62 83.9,-7.7 83.82,-7.734 -1.905,-7.734 -1.906,-7.734 -1.945,-7.717 -1.985,-7.7 -1.986,-7.7 -2.002,-7.66 -2.019,-7.62 -2.019,-7.619 -1.384,116.841 -1.367,116.88 -1.35,116.92 -1.35,116.921 -1.31,116.937 -1.27,116.954 83.82,116.954
GND on Bottom Layer "Bottom Layer-GND" (solid, remove dead copper, pour order 1011): 167.72,118.825 167.754,118.745 167.754,-3.81 167.72,-3.89 167.64,-3.924 -3.175,-3.924 -3.215,-3.907 -3.255,-3.891 -3.255,-3.89 -3.272,-3.85 -3.289,-3.811 -3.924,118.744 -3.924,118.745 -3.907,118.785 -3.891,118.825 -3.89,118.825 -3.851,118.842 -3.811,118.859 -3.81,118.859 167.64,118.859
VCC on VCC Plane (split plane): 164.298,0.802 0.802,0.802 0.802,114.209 164.298,114.209
GND on GND Plane (split plane): 164.298,0.802 48.15,0.802 48.15,22.7 48.147,22.729 48.144,22.759 48.127,22.815 48.117,22.833 48.099,22.867 48.079,22.892 48.062,22.912 47.15,23.824 47.15,35.7 47.147,35.729 47.144,35.759 47.127,35.815 47.117,35.833 47.099,35.867 47.079,35.892 47.062,35.912 45.65,37.324 45.65,41.976 47.062,43.388 47.079,43.408 47.099,43.433 47.117,43.467 47.127,43.485 47.144,43.541 47.147,43.571 47.15,43.6 47.15,53.176 49.362,55.388 49.379,55.408 49.399,55.433 49.417,55.467 49.427,55.485 49.444,55.541 49.447,55.571 49.45,55.6 49.45,60.8 49.444,60.859 49.427,60.915 49.399,60.967 49.362,61.012 49.317,61.049 49.265,61.077 49.209,61.094 49.15,61.1 49.091,61.094 49.035,61.077 48.983,61.049 48.938,61.012 48.901,60.967 48.873,60.915 48.856,60.859 48.85,60.8 48.85,55.724 46.638,53.512 46.601,53.467 46.573,53.415 46.556,53.359 46.553,53.329 46.55,53.3 46.55,43.724 45.138,42.312 45.101,42.267 45.073,42.215 45.056,42.159 45.053,42.129 45.05,42.1 45.05,37.2 45.053,37.171 45.056,37.141 45.073,37.085 45.101,37.033 45.138,36.988 46.55,35.576 46.55,23.7 46.553,23.671 46.556,23.641 46.573,23.585 46.601,23.533 46.638,23.488 47.55,22.576 47.55,0.802 0.802,0.802 0.802,114.209 164.298,114.209

## Keep-outs
Top Layer:
  circle w0.254: c134.62,73.66 r12.141
  circle w0.254: c30.48,73.66 r12.141
  lines w0.4: 117.15,24.6 117.15,23.4 129.15,23.4 129.15,24.6 ; 117.15,27.6 117.15,28.8 129.15,28.8 129.15,27.6
Keep-Out Layer:
  the board outline again, w0.8

## Other copper
Top Layer:
  region net VCC: 4.68,83.2 4.68,72.1 15.75,72.1 15.75,83.2
  rectangle net VCCAUX: 132.9,42.4 144.55,55.2
  rectangle net VCCINT: 133.55,20.2 143.95,31.8
VCC Plane (plane layer: these items are gaps in the copper):
  lines w1.8: 10.45,7.6 11.35,7.6 ; 10.45,13.2 11.35,13.2 ; 12.45,5.15 13.35,5.15 ; 12.45,11.3 13.35,11.3 ; 12.45,16.95 13.35,16.95 ; 21.95,7.6 22.85,7.6 ; 21.95,13.2 22.85,13.2 ; 23.95,5.15 24.85,5.15 ; 23.95,11.3 24.85,11.3 ; 23.95,16.95 24.85,16.95 ; 98.505,103.435 98.505,105.435 ; 102.255,101.235 104.755,101.235 ; 102.505,107.435 104.505,107.435
GND Plane (plane layer: these items are gaps in the copper):
  lines w0.254: 11.799,4.302 cw(c12.696,5.138) 11.818,5.994 ; 12.319,4.191 13.462,4.191 ; 12.338,6.109 13.481,6.109 ; 13.982,4.306 ccw(c13.104,5.162) 14.001,5.998 ; 23.299,4.302 cw(c24.196,5.138) 23.318,5.994 ; 23.819,4.191 24.962,4.191 ; 23.838,6.109 24.981,6.109 ; 25.482,4.306 ccw(c24.604,5.162) 25.501,5.998 ; 97.536,103.251 97.536,105.537 ; 97.622,102.762 ccw(c98.478,103.641) 99.314,102.743 ; 97.622,106.064 cw(c98.458,105.167) 99.314,106.045 ; 99.441,103.251 99.441,105.537 ; 101.876,106.552 cw(c102.773,107.388) 101.895,108.244 ; 102.403,106.466 104.689,106.466 ; 102.403,108.371 104.689,108.371 ; 105.178,106.552 ccw(c104.299,107.408) 105.197,108.244
  lines w0.597: 47.85,-0.1 47.85,22.7 46.85,23.7 46.85,35.7 45.35,37.2 45.35,42.1 46.85,43.6 46.85,53.3 49.15,55.6 49.15,60.8
  lines w1.8: 10.45,7.6 11.35,7.6 ; 10.45,13.2 11.35,13.2 ; 12.45,11.3 13.35,11.3 ; 12.45,16.95 13.35,16.95 ; 21.95,7.6 22.85,7.6 ; 21.95,13.2 22.85,13.2 ; 23.95,11.3 24.85,11.3 ; 23.95,16.95 24.85,16.95 ; 102.255,101.235 104.755,101.235

## Silkscreen, mask and mechanical layers (free items; w line width, h text height)
Top Overlay:
  circle w1: c96.95,111.254 r0.458
  circle w0.508: c134.62,73.66 r10
  circle w0.508: c30.48,73.66 r10
  circle w0.254: c159.918,5.08 r4
  circle w0.254: c5.08,5.08 r4
  circle w0.254: c5.08,109.931 r4
  circle w0.254: c159.969,109.931 r4
  rectangle: 44.55,63 57.05,73.5
  rectangle: 57.25,63 69.75,73.5
  rectangle: 69.95,63 82.45,73.5
  rectangle: 82.65,63 95.15,73.5
  rectangle: 95.35,63 107.85,73.5
  rectangle: 108.05,63 120.55,73.5
  lines w0.08: 2.178,34.055 2.178,38.119 ; 3.829,65.551 3.829,64.916 4.718,64.027 6.496,64.027 7.004,63.519 ; 6.75,34.055 6.75,38.119 ; 7.004,58.947 8.401,58.947 9.163,59.709 ; 9.036,34.309 9.036,38.119 ; 11.068,64.662 12.338,64.662 12.592,64.408 ; 11.703,25.8 11.703,24.276 11.957,24.022 ; 16.402,101.492 17.672,101.492 ; 16.656,34.309 16.656,38.119 ; 19.196,34.309 19.196,38.119 ; 21.863,34.309 21.863,38.119 ; 24.403,34.309 24.403,38.119 ; 26.943,34.309 26.943,38.119 ; 40.15,14.1 48.35,14.1 ; 47.39,97.555 47.644,97.555 48.279,96.92 ; 62.376,93.364 62.681,93.059 80.867,93.059 81.299,93.491 82.061,93.491 ; 85.617,94.253 80.791,94.253 ; 131.083,11.576 131.972,10.687 132.48,10.687 ; 152.038,76.981 152.038,77.362 ; 155.086,75.838 155.086,77.362 ; 157.118,63.9 158.388,65.17 ; 157.626,77.362 158.896,76.092 159.658,76.092 ; 48.35,14.1 47.65,14.2 47.65,14 48.35,14.1 ; 80.791,94.253 81.491,94.153 81.491,94.353 80.791,94.253
  lines w0.2: 1.605,30.075 1.605,34.795 ; 27.605,30.075 27.605,34.795 ; 93.013,111.254 94.029,111.254 ; 93.521,110.746 93.521,111.762 ; 94.537,111.254 96.061,111.254 ; 95.47,110.4 ccw(c96.95,111.254) 95.47,112.108
  text "GND" at 47.15,113.2 h1.1
  text "5 VDC" at 85.05,110.6 h1.5
  text "PWR" at 93.85,99.5 h1.1
  text "CTS" at 26.35,94.4 h1
  text "RTS" at 29.75,94.4 h1
  text "RXD" at 36.15,94.4 h1
  text "TXD" at 39.55,94.4 h1
  text "GND" at 161.15,38.1 h1.1
  text "GND" at 106.15,18.8 h1.1
  text "GND" at 31.35,12 h1.1
  text "LOADED" at 146.05,11.5 h1.1
  text "USER HEADER A" at 91.95,9.8 h1.1
  text "USER HEADER B" at 116.25,9.7 h1.1
  text "TEST/RESET" at 143.75,3.1 h1.1
  text "LINE" at 10.25,2.3 h1.1
  text "HEAD" at 20.95,2.3 h1.1
  text "VOLUME" at 30.35,1 h1.1
  text "5V" at 73.05,1 h1.1
  text "3V3" at 75.75,1 h1.1
  text "5V" at 108.65,1 h1.1
  text "3V3" at 111.35,1 h1.1
  text "OUT" at 10.25,0.8 h1.1
  text "PHONE" at 20.95,0.8 h1.1
Bottom Overlay:
  lines w0.08: 71.393,34.69 72.79,34.69 73.552,35.452 81.807,35.452 82.188,35.833 82.188,36.341 ; 73.806,39.008 75.457,37.357 77.616,37.357 ; 76.092,41.675 76.092,43.961 ; 76.219,25.8 76.219,28.34 ; 80.918,26.689 80.918,28.34 ; 82.95,33.674 82.95,33.928 83.458,34.436 91.713,34.436 ; 84.982,41.675 84.982,43.072 ; 87.014,43.707 87.014,44.596 ; 88.538,28.34 89.3,27.578 89.3,27.07 ; 88.919,41.675 88.919,43.453
Unplated Route Details:
  lines w2.4: 0,-1.2 51.7,-1.2 ; 0,116.211 51.7,116.211 ; 56.7,-1.2 108.4,-1.2 ; 56.7,116.211 108.4,116.211 ; 113.4,-1.2 165.1,-1.2 ; 113.4,116.211 165.1,116.211
Unit PCB Boundaries:
  the board outline again, w0.2
  text "Unit PCB boundaries coincide with centre-lines of tracks" at 0,-8 h0.75
Gerber ID:
  text ".Layer_Name" at 0,-6 h0.75
Dimensions:
  text "Dimensions in millimetres" at 0,-10 h0.75
Design Information:
  drawing of 719 lines, arcs and shapes, not listed
  text "EB1 REV1.02" at 313.547,253.474 h1.27
  text "DESIGN INFORMATION" at 257.54,253.347 h1.52
  text "BOARD NAME:" at 295.132,253.347 h1.52
  text "BOARD TECHNOLOGY" at 257.54,250.807 h1.52
  text "BOARD SIZE (REFER ALSO PROFILING INFORMATION)" at 305.8,250.807 h1.27
  text "115.01mm" at 313.52,248.533 h1.52
  text "11.811" at 273.339,248.445 h1.52
  text "165.10mm" at 336.52,248.433 h1.52
  text "7.874" at 287.309,248.318 h1.52
  text "5.000" at 260.366,248.267 h1.52
  text "(Unit)" at 352.59,248.209 h1.52
  text "X" at 329.469,247.759 h1.78
  text "(MIN. TRACK/   PADS  /CLEARANCE IN 0.001'')" at 256.016,245.727 h1.27
  text "MINIMUM ANNULAR RING 0.05MM (0.002'') EXTERNAL PER IPC-2221 CLASS 3 LEVEL C AND IS THE" at 257.54,243.187 h1.27
  text "MANUFACTURING REGISTRATION ALLOWANCE" at 257.54,240.901 h1.27
  text "LAND SIZE CALCULATION MINIMUM - NOMINAL HOLE SIZE + 0.508MM (0.020'')" at 257.54,238.107 h1.27
  text "AS INSTRUCTED" at 343.57,233.713 h1.52
  text "X" at 295.183,233.586 h1.52
  text "CIRCUIT TYPE:" at 257.54,233.535 h1.52
  text "SS" at 280.4,233.535 h1.27
  text "DS" at 298.18,233.535 h1.27
  text "X" at 312.785,233.535 h1.52
  text "PTH" at 315.96,233.535 h1.27
  text "ML" at 326.882,233.535 h1.27
  text "X" at 330.692,233.535 h1.52
  text "No. OFF" at 333.74,233.535 h1.27
  text "FINGER CONNECTOR DIM PER:" at 257.54,230.487 h1.52
  text "AS SHOWN" at 333.74,230.487 h1.27
  text "No. OFF TOTAL" at 274.304,227.693 h1.52
  text "ONE SIDE" at 315.96,227.693 h1.27
  text "BOTH SIDES" at 333.74,227.439 h1.27
  text "VIAS:" at 257.54,224.772 h1.52
  text "NONE" at 268.97,224.772 h1.14
  text "X" at 277.352,224.772 h1.52
  text "FEED THRU'" at 280.4,224.772 h1.14
  text "X" at 295.132,224.772 h1.52
  text "TENTED" at 298.18,224.772 h1.14
  text "BURIED LAYER SEQUENCE" at 315.96,224.772 h1.14
  text "UNIQUE DRILL" at 280.4,221.724 h1.14
  text "2 SIZE" at 298.18,221.724 h1.14
  text "BLIND LAYER SEQUENCE" at 315.96,221.724 h1.14
  text "Layer Stack Manager (Protel)" at 292.973,219.438 h1.27
  text "X" at 330.692,219.438 h1.52
  text "AS SHOWN" at 333.74,219.438 h1.27
  text "LAYER CONSTRUCTION PER:" at 257.54,219.311 h1.52
  text "Protel" at 338.566,216.771 h1.27
  text "(PFW)" at 348.853,216.644 h1.27
  text "ARTWORK:" at 257.54,216.517 h1.52
  text "MANUAL" at 280.4,216.517 h1.27
  text "DIGITISED" at 298.18,216.517 h1.27
  text "X" at 312.912,216.517 h1.52
  text "CAD" at 315.96,216.517 h1.27
  text "TYPE" at 326.882,216.517 h1.27
  text "ARTWORK/PATTERN MASTER LIST" at 257.54,211.818 h1.52
  text "DESCRIPTION" at 258.81,209.405 h1.27
  text "DRAWING No./CAD FILE REF." at 277.479,209.405 h1.27
  text "LAYER NAME" at 318.754,209.405 h1.27
  text "GERBER FILE REF" at 339.506,209.329 h1.27
  text "PCB FILE" at 257.256,206.941 h1.27
  text "EB_Spartan_III" at 277.627,206.865 h1.27
  text "PcbDoc" at 308.869,206.865 h1.02
  text "Top Paste Mask" at 317.048,204.401 h1.02
  text "GTP" at 359.669,204.325 h1.27
  text "GERBER FILE" at 257.256,204.274 h1.27
  text "GTO" at 359.618,201.836 h1.27
  text "Top Overlay" at 317.048,201.81 h1.02
  text "GERBER FILE" at 257.256,201.734 h1.27
  text "Top Solder Mask" at 317.048,199.372 h1.02
  text "GTS" at 359.669,199.245 h1.27
  text "GERBER FILE" at 257.256,199.194 h1.27
  text "TOP LAYER" at 317.048,196.781 h1.02
  text "GTL" at 359.669,196.705 h1.27
  text "GERBER FILE" at 257.256,196.654 h1.27
  text "GERBER FILE" at 257.256,194.114 h1.27
  text "MIDLAYER1" at 317.19,194.109 h1.02
  text "G1" at 359.69,194.109 h1.27
  text "INTERNALPLANE1" at 317.048,191.741 h1.02
  text "GERBER FILE" at 257.256,191.574 h1.27
  text "GP1" at 359.669,191.565 h1.27
  text "INTERNALPLANE2" at 317.048,189.201 h1.02
  text "GP2" at 359.618,189.076 h1.27
  text "GERBER FILE" at 257.256,189.034 h1.27
  text "MIDLAYER2" at 317.048,186.661 h1.02
  text "GERBER FILE" at 257.256,186.494 h1.27
  text "G2" at 359.69,186.509 h1.27
  text "BOTTOMLAYER" at 317.048,184.101 h1.02
  text "GBL" at 359.669,184.025 h1.27
  text "GERBER FILE" at 257.256,183.954 h1.27
  text "Bottom Solder Mask" at 317.048,181.612 h1.02
  text "GBS" at 359.669,181.485 h1.27
  text "GERBER FILE" at 257.256,181.414 h1.27
  text "Bottom Overlay" at 317.048,179.021 h1.02
  text "GBO" at 359.669,178.945 h1.27
  text "GERBER FILE" at 257.256,178.874 h1.27
  text "Bottom Paste Mask" at 317.048,176.532 h1.02
  text "GBP" at 359.669,176.405 h1.27
  text "GERBER FILE" at 257.256,176.334 h1.27
  text "PCB Boundary" at 317.048,173.941 h1.02
  text "GM5" at 359.669,173.865 h1.27
  text "GERBER FILE" at 257.256,173.794 h1.27
  text "Peelable Solder Mask" at 317.048,171.401 h1.02
  text "GM2" at 359.669,171.325 h1.27
  text "GERBER FILE" at 257.256,171.254 h1.27
  text "Unplated Route Details" at 317.048,168.861 h1.02
  text "GM3" at 359.669,168.785 h1.27
  text "GERBER FILE" at 257.256,168.714 h1.27
  text "Plated Route Details" at 317.048,166.321 h1.02
  text "GM4" at 359.669,166.245 h1.27
  text "GERBER FILE" at 257.256,166.174 h1.27
  text "APERTURE LIST" at 257.256,163.811 h1.27
  text "APR" at 309.869,163.735 h1.27
  text "DRILL REPORT" at 257.256,161.271 h1.27
  text "DRR" at 309.869,161.195 h1.27
  text "EXCELLON DRILL" at 257.256,158.731 h1.27
  text "TXT" at 309.869,158.655 h1.27
  text "MATERIAL:" at 257.54,150.731 h1.52
  text "GLASS FIBRE EPOXY RESIN NEMA GRADE FR4 (MIL-S-13949H)" at 283.194,150.477 h1.27
  text "X" at 280.527,150.35 h1.52
  text "THICKNESS:" at 265.414,147.556 h1.27
  text "0.8mm" at 283.194,147.556 h1.27
  text "1.2mm" at 300.847,147.556 h1.27
  text "1.6mm" at 318.5,147.556 h1.27
  text "2.4mm" at 336.28,147.556 h1.27
  text "3.2mm" at 354.06,147.556 h1.27
  text "X" at 316.087,147.429 h1.52
  text "TOLERANCE:" at 265.287,144.508 h1.27
  text "IN A/W IPC-D-300G CLASS" at 282.94,144.508 h1.27
  text "3 LEVEL B" at 317.865,144.508 h1.27
  text "OTHER +/-" at 336.28,144.508 h1.27
  text "X" at 280.527,144.381 h1.52
  text "BOW & TWIST:" at 262.874,141.46 h1.27
  text "IN A/W IPC-D-300G CLASS" at 282.94,141.46 h1.27
  text "3 LEVEL B" at 317.865,141.46 h1.27
  text "AS SHOWN" at 336.407,141.333 h1.27
  text "X" at 280.527,141.206 h1.52
  text "COPPER THICKNESS (FINISHED)" at 265.287,138.158 h1.27
  text "OUTER:" at 270.113,135.872 h1.27
  text "18um" at 283.194,135.872 h1.27
  text "35um" at 310.245,135.872 h1.27
  text "70um" at 336.534,135.872 h1.27
  text "X" at 307.502,135.669 h1.52
  text "INNER SIGNAL:" at 261.731,132.824 h1.27
  text "18um" at 283.194,132.824 h1.27
  text "35um" at 310.245,132.824 h1.27
  text "70um" at 336.534,132.824 h1.27
  text "X" at 307.451,132.621 h1.52
  text "INNER PWR:" at 265.414,129.776 h1.27
  text "18um" at 283.194,129.776 h1.27
  text "35um" at 310.245,129.776 h1.27
  text "70um" at 336.534,129.776 h1.27
  text "X" at 307.578,129.649 h1.52
  text "STRUCTURE:" at 257.54,126.728 h1.52
  text "REFER" at 283.194,126.728 h1.27
  text "AS PER DRAWING No." at 283.067,123.553 h1.27
  text "AS SHOWN" at 336.407,123.553 h1.27
  text "X" at 333.867,123.426 h1.52
  text "DRILLING:" at 257.54,120.759 h1.52
  text "VIEWED FROM:" at 262.493,118.473 h1.27
  text "COMPONENT SIDE" at 283.194,118.473 h1.14
  text "SOLDER SIDE" at 309.991,118.473 h1.14
  text "X" at 280.527,118.219 h1.52
  text "REFERENCE:" at 264.779,115.425 h1.27
  text "AS SHOWN" at 283.067,115.298 h1.14
  text "PATTERN MASTER LIST" at 310.118,115.298 h1.14
  text "X" at 333.867,115.298 h1.52
  text "NC_DRILL FILES" at 336.407,115.298 h1.14
  text "X" at 280.527,115.171 h1.52
  text "PTH MINIMUM COPPER THICKNESS:" at 270.621,112.377 h1.27
  text "20um" at 310.245,112.377 h1.27
  text "X" at 307.578,112.25 h1.52
  text "OTHER" at 336.407,112.25 h1.27
  text "NPTH:" at 271.129,109.329 h1.27
  text "TENTED" at 283.067,109.202 h1.14
  text "X" at 307.578,109.202 h1.52
  text "PADS REMOVED" at 310.118,109.202 h1.14
  text "REMOVE PADS" at 336.407,109.202 h1.14
  text "X" at 280.527,109.075 h1.52
  text "2nd DRILL" at 283.067,106.154 h1.14
  text "BOTH" at 310.118,106.154 h1.14
  text "AS SHOWN" at 322.437,106.154 h1.14
  text "NONE" at 336.407,106.154 h1.14
  text "BOARD FINISH:" at 257.54,103.233 h1.52
  text "X" at 280.527,103.106 h1.52
  text "ETCHING" at 283.067,103.106 h1.14
  text "REFER PATTERN MASTER LIST" at 310.118,103.106 h1.14
  text "LEGEND / SCREEN PRINT:" at 277.86,100.185 h1.27
  text "NONE" at 310.118,100.058 h1.14
  text "COMPONENT" at 322.437,100.058 h1.14
  text "SOLDER" at 336.407,100.058 h1.14
  text "X" at 319.897,99.931 h1.52
  text "X" at 333.867,99.931 h1.52
  text "COLOUR:" at 268.081,97.137 h1.27
  text "WHITE" at 283.067,97.01 h1.14
  text "YELLOW" at 310.118,97.01 h1.14
  text "OTHER" at 336.407,97.01 h1.14
  text "X" at 280.527,96.883 h1.52
  text "X" at 280.527,93.962 h1.52
  text "LIQUID PHOTOIMAGEABLE" at 283.067,93.962 h1.14
  text "SCREEN PRINT" at 322.437,93.962 h1.14
  text "MATTE" at 283.067,90.914 h1.14
  text "GLOSS" at 295.767,90.914 h1.14
  text "GREEN" at 310.118,90.914 h1.14
  text "BLUE" at 322.437,90.914 h1.14
  text "G/Y" at 336.407,90.914 h1.14
  text "OTHER" at 347.837,90.914 h1.14
  text "X" at 293.1,90.787 h1.52
  text "SOLDER MASK COLOUR:" at 257.54,87.993 h1.14
  text "BLACK" at 283.067,87.866 h1.14
  text "GREEN" at 295.767,87.866 h1.14
  text "YELLOW" at 310.118,87.866 h1.14
  text "BLUE" at 322.437,87.866 h1.14
  text "OTHER" at 336.407,87.866 h1.14
  text "X" at 280.4,87.739 h1.52
  text "TRACK FINISH:" at 257.54,84.945 h1.52
  text "SELECTIVE SOLDER (HASL)" at 283.067,84.818 h1.14
  text "REFLOW SOLDER" at 322.437,84.818 h1.14
  text "SELECTIVE GOLD" at 283.067,81.77 h1.14
  text "um  (AREA" at 310.118,81.77 h1.14
  text "sq. mm)" at 337.931,81.77 h1.14
  text "IMMERSION GOLD" at 330.69,79.409 h1.27
  text "REFER PATTERN MASTER LIST" at 283.067,78.722 h1.14
  text "OTHER" at 322.437,78.722 h1.14
  text "X" at 319.927,78.718 h1.52
  text "EDGE BOARD" at 257.54,75.801 h1.52
  text "1.3um HARD GOLD OVER 5um     NICKEL / TIN-NICKEL" at 283.067,75.674 h1.14
  text "CONTACTS:" at 257.54,73.642 h1.52
  text "HARD FINISH GOLDE PLATE" at 283.067,72.626 h1.14
  text "OTHER" at 322.437,72.626 h1.14
  text "AS SHOWN" at 283.067,69.578 h1.14
  text "REFER" at 322.437,69.578 h1.14
  text "PROFILING:" at 257.54,66.53 h1.52
  text "AS DIMENSIONED, MEASURED AND CUT FROM SPECIFIED DATUM." at 283.067,66.53 h1.14
  text "X" at 280.527,66.403 h1.52
  text "REFER PCB BLANK DWG No." at 283.194,63.609 h1.27
  text "USE PROFILE / ROUTE TAPE SUPPLIED (REFER PATTERN MASTER LIST)" at 283.194,60.561 h1.27
  text "SQUARE CUT" at 283.194,57.513 h1.27
  text "N.C. ROUTE" at 300.974,57.513 h1.27
  text "V. SCORE" at 318.754,57.513 h1.27
  text "BLANK" at 336.534,57.513 h1.27
  text "ACCEPTABILITY:" at 257.54,54.846 h1.52
  text "MATERIALS AND WORKMANSHIP FOR ALL PRINTED WIRING BOARDS TO MEET" at 279.765,54.719 h1.27
  text "OR EXCEED THE REQUIREMENTS OF:" at 279.765,51.925 h1.27
  text "IPC-6011/12 AND IPC-A-600E" at 283.321,49.258 h1.27
  text "1" at 318.881,49.258 h1.27
  text "2" at 327.771,49.258 h1.27
  text "X" at 325.104,49.131 h1.52
  text "X" at 280.654,49.004 h1.52
  text "3" at 336.661,47.099 h1.27
  text "UL CERTIFICATION" at 283.321,46.21 h1.27
  text "AUSTEL" at 318.881,46.21 h1.27
  text "X" at 280.654,46.083 h1.52
  text "ML-P-55110F GRP" at 282.813,43.162 h1.02
  text "A" at 301.101,43.162 h1.27
  text "B" at 309.991,43.162 h1.27
  text "AS2546" at 318.881,43.162 h1.27
  text "OTHER" at 336.661,43.162 h1.27
  text "ADDITIONAL" at 257.54,40.241 h1.52
  text "NONE" at 283.321,39.987 h1.27
  text "SAMPLE PLAN" at 301.101,39.987 h1.27
  text "MIL-P-55110E SERIAL Nos. PER ORDER" at 318.881,39.987 h1.27
  text "REQUIREMENTS:" at 257.54,37.828 h1.52
  text "NONE" at 283.321,36.939 h1.27
  text "ML-P-55110F GRP" at 300.593,36.939 h1.02
  text "A" at 318.881,36.939 h1.27
  text "B" at 327.771,36.939 h1.27
  text "IPC CLASS:" at 333.74,36.939 h1.27
  text "1" at 349.234,36.939 h1.27
  text "2" at 355.584,36.939 h1.27
  text "3" at 361.934,36.939 h1.27
  text "QUALITY RELEASE REPORT" at 301.101,33.891 h1.27
  text "OTHER" at 341.614,33.891 h1.27
  text "PER ORDER" at 350.123,33.764 h1.27
  text "X" at 338.947,33.637 h1.52
  text "NONE" at 301.101,30.843 h1.27
  text "REQUIRED" at 318.881,30.843 h1.27
  text "PER ORDER" at 341.741,30.843 h1.27
  text "ELECTRICAL TEST:" at 257.54,30.716 h1.52
  text "X" at 316.214,30.716 h1.52
  text "NONE" at 301.101,27.795 h1.27
  text "1 SIDE" at 318.754,27.795 h1.14
  text "2 SIDES" at 329.93,27.795 h1.14
  text "MIN. PITCH" at 341.614,27.795 h1.27
  text "0.65mm" at 355.203,27.795 h1.27
  text "SURFACE MOUNT:" at 257.54,27.668 h1.52
  text "X" at 327.695,27.592 h1.52
  text "NONE" at 301.101,24.747 h1.27
  text "FOIL" at 318.881,24.747 h1.27
  text "LEGEND" at 330.311,24.747 h1.27
  text "REFER" at 341.614,24.747 h1.27
  text "MANUFACTURER'S ID/LOGO:" at 257.54,24.62 h1.52
  text "ISO9001/AS3901" at 304.911,21.699 h1.27
  text "NONE" at 341.614,21.699 h1.27
  text "MANUFACTURER'S ACCREDITATION:" at 257.54,21.572 h1.52
  text "X" at 302.244,21.572 h1.52
  text "PER ORDER" at 301.101,18.651 h1.27
  text "REFER" at 318.881,18.651 h1.27
  text "PACKAGING AND HANDLING:" at 257.54,18.524 h1.52
  text "X" at 298.434,18.397 h1.52
Mechanical 15:
  lines w0.2: 82.55,0 82.55,114.935
Sheet:
  drawing of 1882 lines, arcs and shapes, not listed
  text "1" at 4.117,258.591 h1.78
  text "2" at 53.156,258.591 h1.78
  text "3" at 102.415,258.591 h1.78
  text "4" at 151.708,258.591 h1.78
  text "5" at 200.984,258.591 h1.78
  text "6" at 250.006,258.591 h1.78
  text "7" at 299.536,258.591 h1.78
  text "8" at 348.558,258.591 h1.78
  text "A" at -18.015,224.606 h1.78
  text "A" at 370.605,224.606 h1.78
  text "B" at -18.015,153.994 h1.78
  text "B" at 370.605,153.994 h1.78
  text "C" at -18.015,83.382 h1.78
  text "C" at 370.605,83.382 h1.78
  text "D" at -18.015,13.278 h1.78
  text "D" at 370.605,13.278 h1.78
  text "ENGINEER:" at 255.67,13.1 h1.14
  text "TITLE:" at 293.77,13.1 h1.14
  text "PCB DESIGNER:" at 255.67,5.607 h1.14
  text "DATE:" at 255.67,-2.14 h1.14
  text "PART NO.:" at 293.77,-2.14 h1.14
  text "REV:" at 347.11,-2.14 h1.14
  text "Altium Limited" at 222.65,-4.68 h1.78
  text ".PRINT_DATE" at 256.94,-5.188 h1.78
  text "12a Rodborough Rd" at 222.65,-7.22 h1.78
  text "Frenchs Forest" at 222.65,-9.76 h1.78
  text "FILE NAME:" at 255.67,-9.76 h1.14
  text "DWG NO:" at 293.77,-9.76 h1.14
  text "SCALE:" at 347.11,-9.76 h1.14
  text "NSW 2086" at 222.65,-12.3 h1.78
  text ".PCB_FILE_NAME_NO_PATH" at 256.94,-12.808 h1.78
  text "1" at 4.117,-18.269 h1.78
  text "2" at 53.156,-18.269 h1.78
  text "3" at 102.415,-18.269 h1.78
  text "4" at 151.708,-18.269 h1.78
  text "5" at 200.984,-18.269 h1.78
  text "6" at 250.006,-18.269 h1.78
  text "7" at 299.536,-18.269 h1.78
  text "8" at 348.558,-18.269 h1.78
Drill Drawing:
  text ".Legend" at 168,0 h0.75

## Dimensions
0,0 to 0,115.011 on Dimensions
0,0 to 165.1,0 on Dimensions

## Text inside footprints (layer, text, board x,y; h text height)
HDR1: Top Overlay "2" at 82.423,8.128 h0.8 r90; Top Overlay "1" at 82.423,1.651 h0.8 r90; Top Overlay "19" at 105.283,0.508 h0.8 r90; Top Overlay "20" at 105.283,8.128 h0.8 r90; Top Overlay "16" at 100.203,8.128 h0.8 r90; Top Overlay "12" at 95.123,8.128 h0.8 r90; Top Overlay "6" at 87.503,8.128 h0.8 r90; Top Overlay "15" at 100.203,0.508 h0.8 r90; Top Overlay "11" at 95.123,0.889 h0.8 r90; Top Overlay "5" at 87.503,1.397 h0.8 r90; Top Overlay "3" at 84.963,1.397 h0.8 r90; Top Overlay "4" at 84.963,8.128 h0.8 r90; Top Overlay "7" at 90.043,1.397 h0.8 r90; Top Overlay "8" at 90.043,8.128 h0.8 r90; Top Overlay "9" at 92.583,1.397 h0.8 r90; Top Overlay "10" at 92.583,8.128 h0.8 r90; Top Overlay "13" at 97.663,0.508 h0.8 r90; Top Overlay "14" at 97.663,8.128 h0.8 r90; Top Overlay "17" at 102.743,0.508 h0.8 r90; Top Overlay "18" at 102.743,8.128 h0.8 r90
HDR2: Top Overlay "2" at 117.948,8.128 h0.8 r90; Top Overlay "1" at 117.948,1.651 h0.8 r90; Top Overlay "19" at 140.808,0.508 h0.8 r90; Top Overlay "20" at 140.808,8.128 h0.8 r90; Top Overlay "16" at 135.728,8.128 h0.8 r90; Top Overlay "12" at 130.648,8.128 h0.8 r90; Top Overlay "6" at 123.028,8.128 h0.8 r90; Top Overlay "15" at 135.728,0.508 h0.8 r90; Top Overlay "11" at 130.648,0.889 h0.8 r90; Top Overlay "5" at 123.028,1.397 h0.8 r90; Top Overlay "3" at 120.488,1.397 h0.8 r90; Top Overlay "4" at 120.488,8.128 h0.8 r90; Top Overlay "7" at 125.568,1.397 h0.8 r90; Top Overlay "8" at 125.568,8.128 h0.8 r90; Top Overlay "9" at 128.108,1.397 h0.8 r90; Top Overlay "10" at 128.108,8.128 h0.8 r90; Top Overlay "13" at 133.188,0.508 h0.8 r90; Top Overlay "14" at 133.188,8.128 h0.8 r90; Top Overlay "17" at 138.268,0.508 h0.8 r90; Top Overlay "18" at 138.268,8.128 h0.8 r90
J1S: Top Overlay "1" at 158.982,93.108 h0.8 r180; Top Overlay "14" at 160.125,90.568 h0.8 r180; Top Overlay "13" at 124.819,93.108 h0.8 r180; Top Overlay "26" at 124.819,90.568 h0.8 r180
J2: Mechanical 15 "PCB Edge" at 122.55,114.5 h0.25
J3: Mechanical 15 "PCB Edge" at 140.15,114.5 h0.25
J4: Top Overlay "1" at 21.336,105.156 h0.8; Top Overlay "5" at 32.893,105.156 h0.8; Top Overlay "9" at 31.242,107.95 h0.8; Top Overlay "6" at 22.86,107.95 h0.8
J5: Top Overlay "11" at 60.198,105.664 h0.8; Top Overlay "5" at 72.771,100.457 h0.8; Top Overlay "15" at 72.644,105.664 h0.8; Top Overlay "1" at 60.96,100.457 h0.8
Logo3: Top Overlay "REV 1.02" at 92.74,96.92 h1.3; Top Overlay "EB1" at 87.66,96.92 h1.3
U2S: Top Overlay "1" at 7.36,69.025 h0.8; Top Overlay "3" at 12.182,69.025 h0.8; Top Overlay "2" at 9.642,68.982 h0.8
U3S: Top Overlay "2" at 146.518,48.032 h0.8 r90; Top Overlay "3" at 146.475,50.572 h0.8 r90; Top Overlay "1" at 146.475,45.75 h0.8 r90
U4S: Top Overlay "2" at 146.518,25.527 h0.8 r90; Top Overlay "3" at 146.475,28.067 h0.8 r90; Top Overlay "1" at 146.475,23.245 h0.8 r90